# Altium PCB EVT_SYS_CARRIER.PcbDoc
Units mil, origin at the board's own origin, x right, y up, seen from the top; angles counter-clockwise.
Board outline 3937.01 x 3149.61 mil, 4 copper layers (Top Layer, Mid-Layer 1, Mid-Layer 2, Bottom Layer), stack 63.036 mil thick; 92 components, 67 nets, 529 pads, 0 vias.
Unrouted connection lines stored in the file: 272.
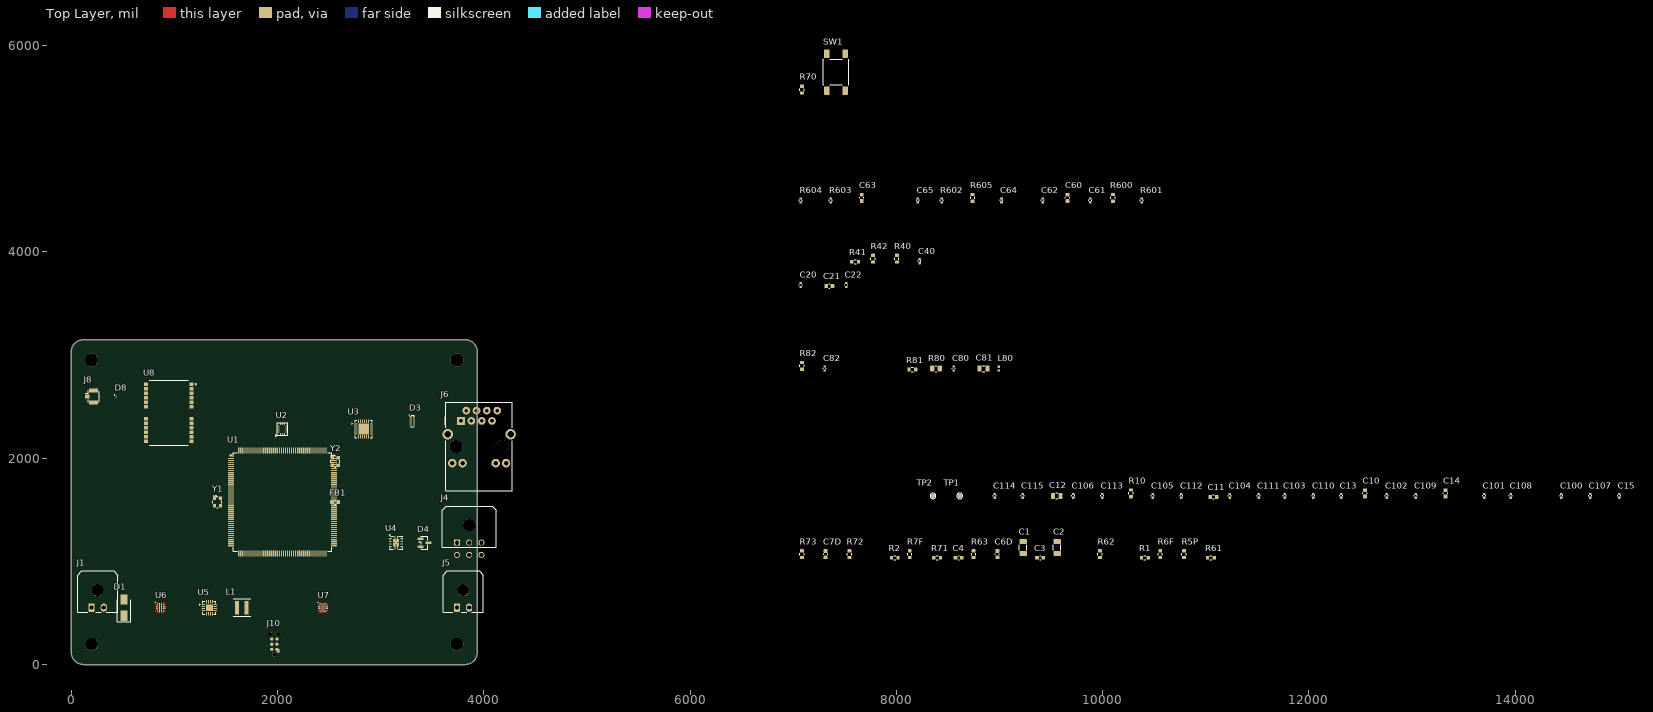
[diagram p0: Top Layer view]
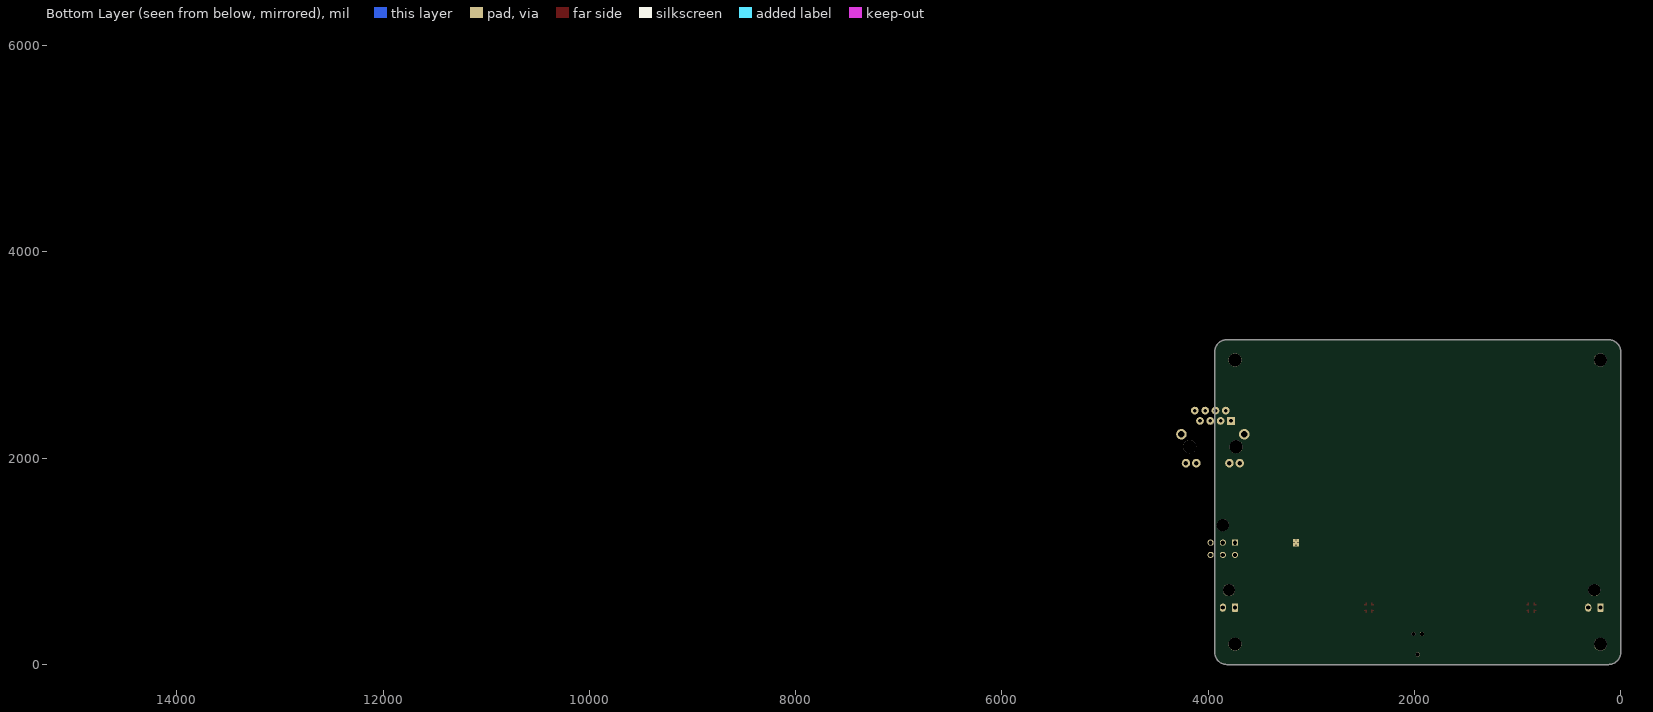
[diagram p1: Bottom Layer view, seen from below]

## Layer stack, top to bottom
Top Solder: solder mask 0.4, Solder Resist, Dk 3.5
Top Layer: signal copper 1.4
Dielectric 2: prepreg 7.0866, PP-006, Dk 4.2
Mid-Layer 1: signal copper 1.378
Dielectric 1: dielectric 43.3071, FR-4, Dk 4.2
Mid-Layer 2: signal copper 1.378
Dielectric 3: prepreg 7.0866, PP-006, Dk 4.2
Bottom Layer: signal copper 1.4
Bottom Solder: solder mask 0.4, Solder Resist, Dk 3.5

## Board outline
118.11,0 cw(c118.11,118.11) 0,118.11 0,3031.5 cw(c118.11,3031.5) 118.11,3149.61 3818.9,3149.61 cw(c3818.9,3031.5) 3937.01,3031.5 3937.01,118.11 cw(c3818.9,118.11) 3818.9,0

## Design rules (kind name [scope] priority, off if disabled: settings)
Clearance R_TIMING_TO_SW_CLEARANCE [InNetClass('NC_TIMING') vs InNet('BUCK_SW')] p1: gap=39.37 ignorepadtopadclearanceinfootprint=FALSE // EVT routing contract
Clearance R_ETH_MDI_CLEARANCE [InDifferentialPairClass('DP_ETH_MDI') vs Not InDifferentialPairClass('DP_ETH_MDI')] p2: gap=7.87 ignorepadtopadclearanceinfootprint=FALSE // EVT routing contract
Clearance R_GENERAL_CLEARANCE [All] p3: gap=7.87 ignorepadtopadclearanceinfootprint=FALSE // EVT routing contract
Clearance [All] p4: gap=10 ignorepadtopadclearanceinfootprint=FALSE
DiffPairsRouting R_CAN_DIFF [InDifferentialPairClass('DP_CAN')] p1: maxlimit=11.81 minlimit=7.87 mostfreqgap=7.87 toplayer_minwidth=7.87 toplayer_maxwidth=11.81 toplayer_prefwidth=7.87 midlayer1_minwidth=7.87 midlayer1_maxwidth=11.81 midlayer1_prefwidth=7.87 midlayer2_minwidth=7.87 midlayer2_maxwidth=11.81 midlayer2_prefwidth=7.87 bottomlayer_minwidth=7.87 bottomlayer_maxwidth=11.81 bottomlayer_prefwidth=7.87 maxuncoupledlength=500 // EVT routing contract
DiffPairsRouting R_ETH_MDI_DIFF [InDifferentialPairClass('DP_ETH_MDI')] p2: maxlimit=7.87 minlimit=7.87 mostfreqgap=7.87 toplayer_minwidth=10.24 toplayer_maxwidth=10.24 toplayer_prefwidth=10.24 midlayer1_minwidth=10.24 midlayer1_maxwidth=10.24 midlayer1_prefwidth=10.24 midlayer2_minwidth=10.24 midlayer2_maxwidth=10.24 midlayer2_prefwidth=10.24 bottomlayer_minwidth=10.24 bottomlayer_maxwidth=10.24 bottomlayer_prefwidth=10.24 maxuncoupledlength=500 // EVT routing contract
DiffPairsRouting [All] p3: maxlimit=10 minlimit=10 mostfreqgap=10 toplayer_minwidth=15 toplayer_maxwidth=15 toplayer_prefwidth=15 midlayer1_minwidth=15 midlayer1_maxwidth=15 midlayer1_prefwidth=15 midlayer2_minwidth=15 midlayer2_maxwidth=15 midlayer2_prefwidth=15 bottomlayer_minwidth=15 bottomlayer_maxwidth=15 bottomlayer_prefwidth=15 maxuncoupledlength=500
PolygonConnect [All] p1: connectstyle=Relief reliefconductorwidth=10 reliefentries=4 polygonreliefangle="90 Angle" airgapwidth=10
RoutingVias [All] p1: holewidth=28 width=50 viastyle="Through Hole" minholewidth=28 minwidth=50 maxholewidth=28 maxwidth=50
SolderMaskExpansion [All] p1: expansion=0 istentingtop=FALSE
Width R_3V3_TRUNK_WIDTH [InNet('3V3')] p1: maxlimit=118.11 minlimit=59.06 preferedwidth=59.06 // EVT routing contract
Width R_RADAR_12V_WIDTH [InNet('RADAR_12V')] p2: maxlimit=118.11 minlimit=59.06 preferedwidth=59.06
Width R_VIN_HIGH_CURRENT [InNet('VIN_RAW','VIN_PROTECTED')] p3: maxlimit=196.85 minlimit=118.11 preferedwidth=118.11
Width R_GNSS_RF_WIDTH [InNet('GNSS_RF')] p4: maxlimit=14.17 minlimit=14.17 preferedwidth=14.17
Width R_GENERAL_WIDTH [All] p5: maxlimit=19.68 minlimit=5.91 preferedwidth=7.87
29 further rules are at their usual default settings.

## Classes and differential pairs
net class NC_IMU_SPI: IMU_MISO IMU_MOSI IMU_NSS IMU_SCK
net class NC_RMII: ETH_50M ETH_CRS_DV ETH_MDC ETH_MDIO ETH_NRST ETH_RXD0 ETH_RXD1 ETH_TX_EN ETH_TXD0 ETH_TXD1
net class NC_TIMING: GNSS_PPS IMU_DRDY RADAR_REF
net class NC_CAN: RADAR_CANH RADAR_CANL
net class NC_GNSS_RF: GNSS_RF
net class NC_ETH_MDI: ETH_RXN ETH_RXP ETH_TXN ETH_TXP
net class NC_POWER_3V3: 3V3 VDDA_FILTERED
net class NC_POWER_12V: RADAR_12V VIN_PROTECTED VIN_RAW
differential pair class DP_CAN: DP_CAN
differential pair class DP_ETH_MDI: DP_ETH_RX DP_ETH_TX
component class 70_DEBUG_BOOT: R70 SW1
component class 60_ETHERNET: C60 C61 C62 C63 C64 C65 D3 J6 R600 R601 R602 R603 R604 R605 U3 Y2
component class 50_RADAR_IO_CAN: C40 D4 J4 J5 R40 R41 R42 U4
component class 40_IMU: C20 C21 C22 U2
component class 30_TIME_GNSS: C80 C81 C82 D8 J8 L80 R80 R81 R82 U8
component class 20_MCU_CORE: C10 C11 C12 C13 C14 C15 C100 C101 C102 C103 C104 C105 C106 C107 C108 C109 C110 C111 C112 C113 C114 C115 FB1 J10 R10 TP1 TP2 U1 Y1
component class 10_POWER_INPUT: C1 C2 C3 C4 C6D C7D D1 J1 L1 R1 R2 R5P R6F R7F R61 R62 R63 R71 R72 R73 U5 U6 U7
differential pair DP_CAN: +RADAR_CANH -RADAR_CANL
differential pair DP_ETH_RX: +ETH_RXP -ETH_RXN
differential pair DP_ETH_TX: +ETH_TXP -ETH_TXN

## Components (designator, comment, footprint, x,y, rotation, side; value= is the part's Value field where it differs from the comment)
C1 "10uF/25V" C_1206_3216Metric 9230,1135 r90 top
C2 "22uF/6.3V" C_1206_3216Metric 9560,1135 r90 top
C3 "3.3nF" C_0603_1608Metric 9395,1035 r0 top
C4 "100nF/25V" C_0603_1608Metric 8605,1035 r0 top
C6D "3.3nF" C_0603_1608Metric 8980,1070 r90 top
C7D "3.3nF" C_0603_1608Metric 7315,1070 r90 top
C10 "2.2uF" C_0603_1608Metric 12545,1660 r90 top
C11 "2.2uF" C_0603_1608Metric 11075,1625 r0 top
C12 "4.7uF" C_0805_2012Metric 9555,1635 r0 top
C13 "100nF" C_0402_1005Metric 12315,1635 r90 top
C14 "1uF" C_0603_1608Metric 13325,1660 r90 top
C15 "100nF" C_0402_1005Metric 15010,1635 r90 top
C20 "100nF" C_0402_1005Metric 7075,3680 r90 top
C21 "2.2uF" C_0603_1608Metric 7350,3670 r0 top
C22 "10nF" C_0402_1005Metric 7515,3680 r90 top
C40 "100nF" C_0402_1005Metric 8225,3910 r90 top
C60 "1uF" C_0603_1608Metric 9660,4525 r90 top
C61 "470pF C0G" C_0402_1005Metric 9880,4500 r90 top
C62 "100nF" C_0402_1005Metric 9420,4500 r90 top
C63 "22nF C0G" C_0603_1608Metric 7665,4525 r90 top
C64 "100nF" C_0402_1005Metric 9020,4500 r90 top
C65 "100nF" C_0402_1005Metric 8210,4500 r90 top
C80 "100nF" C_0402_1005Metric 8555,2870 r90 top
C81 "10uF" C_0805_2012Metric 8845,2870 r0 top
C82 "100nF DNP_OPTION" C_0402_1005Metric 7305,2870 r90 top
C100 "100nF VDD" C_0402_1005Metric 14450,1635 r90 top
C101 "100nF VDD" C_0402_1005Metric 13700,1635 r90 top
C102 "100nF VDD" C_0402_1005Metric 12755,1635 r90 top
C103 "100nF VDD" C_0402_1005Metric 11765,1635 r90 top
C104 "100nF VDD" C_0402_1005Metric 11235,1635 r90 top
C105 "100nF VDD" C_0402_1005Metric 10485,1635 r90 top
C106 "100nF VDD" C_0402_1005Metric 9715,1635 r90 top
C107 "100nF VDD" C_0402_1005Metric 14730,1635 r90 top
C108 "100nF VDD" C_0402_1005Metric 13960,1635 r90 top
C109 "100nF VDD" C_0402_1005Metric 13035,1635 r90 top
C110 "100nF VDD" C_0402_1005Metric 12045,1635 r90 top
C111 "100nF VDD" C_0402_1005Metric 11515,1635 r90 top
C112 "100nF VDD" C_0402_1005Metric 10765,1635 r90 top
C113 "100nF VDD" C_0402_1005Metric 9995,1635 r90 top
C114 "100nF VDD33_USB" C_0402_1005Metric 8955,1635 r90 top
C115 "100nF NRST" C_0402_1005Metric 9225,1635 r90 top
D1 "SMAJ15CA" D_SMA 511.81,551.18 r90 top
D3 "TPD4E05U06DQAR" USON-10_2.5x1.0mm_P0.5mm 3307.09,2362.2 r0 top
D4 "ESD2CANFD24-Q1" SOT-23 3425.2,1181.1 r0 top
D8 "ESD0P2RF-02LS" ESD0P2RF-02LS_PG-TSSLP-2-1 433.07,2598.43 r0 top
FB1 "BLM18BD601SH1" L_0603_1608Metric 2559.06,1574.8 r0 top
J1 "12V_IN" Molex_43650-0200_RA_THT_2P 196.85,551.18 r0 top
J4 "RADAR_IO" Molex_43045-0600_RA_THT_6P 3740.16,1181.1 r0 top
J5 "RADAR_PWR" Molex_43650-0200_RA_THT_2P 3740.16,551.18 r0 top
J6 "SI-60182-F" RJ45_Bel_SI-60062-F 3779.53,2362.2 r0 top
J8 "GNSS_UFL" Hirose_UFL_R_SMT_K 196.85,2598.43 r0 top
J10 "TC2030_SWD" TagConnect_TC2030_NL 1968.5,196.85 r90 top
L1 "2.2uH" Coilcraft_XFL4020_4x4 1653.54,551.18 r0 top
L80 "27nH DNP_OPTION" L_0402_1005Metric 8995,2870 r90 top
R1 "665R 1%" R_0603_1608Metric 10410,1035 r0 top
R2 "1.05k 1%" R_0603_1608Metric 7985,1035 r0 top
R5P "100k 1% PG_PU" R_0603_1608Metric 10790,1070 r90 top
R6F "10k 1% FLT_PU" R_0603_1608Metric 10560,1070 r90 top
R7F "10k 1% FLT_PU" R_0603_1608Metric 8130,1070 r90 top
R10 "10k 1%" R_0603_1608Metric 10275,1660 r90 top
R40 "120R 1% DNP_DEFAULT" R_0603_1608Metric 8005,3935 r90 top
R41 "10k 1% STB_PD" R_0603_1608Metric 7600,3905 r0 top
R42 "10k 1% SHDN_PD" R_0603_1608Metric 7775,3935 r90 top
R61 "470k 1%" R_0603_1608Metric 11050,1035 r0 top
R62 "36.0k 1%" R_0603_1608Metric 9975,1070 r90 top
R63 "41.2k 1%" R_0603_1608Metric 8750,1070 r90 top
R70 "0R DNP_BOOT_OVERRIDE" R_0603_1608Metric 7085,5575 r90 top
R71 "470k 1%" R_0603_1608Metric 8395,1035 r0 top
R72 "16.9k 1%" R_0603_1608Metric 7545,1070 r90 top
R73 "43.7k 1%" R_0603_1608Metric 7085,1070 r90 top
R80 "10R 0.25W DNP_OPTION" R_0805_2012Metric 8385,2870 r0 top
R81 "100k 1% VUSB_PD" R_0603_1608Metric 8155,2860 r0 top
R82 "0R V_BCKP" R_0603_1608Metric 7085,2895 r90 top
R600 "12.1k 1%" R_0603_1608Metric 10100,4525 r90 top
R601 "49.9R 1%" R_0402_1005Metric 10380,4500 r90 top
R602 "49.9R 1%" R_0402_1005Metric 8440,4500 r90 top
R603 "49.9R 1%" R_0402_1005Metric 7365,4500 r90 top
R604 "49.9R 1%" R_0402_1005Metric 7075,4500 r90 top
R605 "10k 1% NRST_PD" R_0603_1608Metric 8740,4525 r90 top
SW1 "NRST" ESwitch_TL3301_GullWing_6x6 7415,5745 r90 top
TP1 "DEBUG_TX" TestPoint_Pad_D1.0mm 8615,1635 r0 top
TP2 "DEBUG_RX" TestPoint_Pad_D1.0mm 8355,1635 r0 top
U1 "STM32H753IIT6" LQFP-176_24x24mm_P0.5mm 2047.24,1574.8 r0 top
U2 "ICM-42688-P" ICM-42688-P_LGA14_2.5x3mm_P0.5mm 2047.24,2283.46 r0 top
U3 "LAN8742Ai-CZ-TR" QFN-24-1EP_4x4mm_P0.5mm_EP2.6x2.6mm 2834.65,2283.46 r0 top
U4 "TCAN3404DRBRQ1" Texas_DRB0008A 3149.61,1181.1 r0 top
U5 "TPS62132RGTR_3V3" VQFN-16-1EP_3x3mm_P0.5mm_EP1.68x1.68mm 1338.58,551.18 r0 top
U6 "TPS259470ARPWR_SYS" TPS259470A_RPW0010A_VQFN-HR-10_2x2mm_P0.475mm 866.14,551.18 r0 top
U7 "TPS259470ARPWR_RADAR" TPS259470A_RPW0010A_VQFN-HR-10_2x2mm_P0.475mm 2440.94,551.18 r0 top
U8 "NEO-M9N-00B" NEO-M9N_LCC24_12.2x16mm 944.88,2440.94 r0 top
Y1 "ECS-2520S33-250-FN-TR" Oscillator_SMD_ECS_2520MV-xxx-xx-4Pin_2.5x2.0mm 1417.32,1574.8 r0 top
Y2 "ECS-2520S33-500-FN-TR" Oscillator_SMD_ECS_2520MV-xxx-xx-4Pin_2.5x2.0mm 2559.06,1968.5 r0 top

## Footprints (in the part's own frame and the unit in brackets; to place one, negate y for a bottom-side part, rotate by r counter-clockwise, add the part's x,y. Pads: shape width x height; smd on the part's side, far side on the other; paste and mask are expansions set on the pad)
C_0402_1005Metric [mm]
  rrect25% 0.56x0.62 smd: 1(-0.48,0) 2(0.48,0)
  silkscreen extent -0.11,-0.36 0.11,0.36
C_0603_1608Metric [mm]
  rrect25% 0.9x0.95 smd: 1(-0.775,0) 2(0.775,0)
  silkscreen extent -0.14,-0.51 0.14,0.51
C_0805_2012Metric [mm]
  rrect25% 1x1.45 smd: 1(-0.95,0) 2(0.95,0)
  silkscreen extent -0.26,-0.73 0.26,0.73
C_1206_3216Metric [mm]
  rrect22% 1.15x1.8 smd: 1(-1.475,0) 2(1.475,0)
  silkscreen extent -0.71,-0.91 0.71,0.91
Coilcraft_XFL4020_4x4 [mm]
  rect 0.98x3.4 smd: 1(-1.185,0) 2(1.185,0)
  silkscreen extent -2.15,-2.15 2.15,2.15
D_SMA [mm]
  rrect14% 2.5x1.8 smd: 1(-2,0) 2(2,0)
  silkscreen extent -3.51,-1.65 2,1.65
ESD0P2RF-02LS_PG-TSSLP-2-1 [mm]
  rect 0.32x0.24 smd: 1(0,0.19) 2(0,-0.19)
  silkscreen extent -0.4,0.32 -0.24,0.48
ESwitch_TL3301_GullWing_6x6 [mm]
  rrect18% 2.1x1.4 smd: 1(-4.55,2.25) 1(4.55,2.25) 2(-4.55,-2.25) 2(4.55,-2.25)
  silkscreen extent -3.1,-3.1 3.1,3.1
Hirose_UFL_R_SMT_K [mm]
  rrect25% 1.05x1 smd: 1(-1.05,0)
  rrect24% 2.2x1.05 smd: 2(0.475,-1.475) 2(0.475,1.475)
  silkscreen extent -1.52,-1.4 1.84,1.4
ICM-42688-P_LGA14_2.5x3mm_P0.5mm [mm]
  rect 0.475x0.25 smd: 1(-1.012,-0.75) 2(-1.012,-0.25) 3(-1.012,0.25) 4(-1.012,0.75) 8(1.012,0.75) 9(1.012,0.25) 10(1.012,-0.25) 11(1.012,-0.75)
  rect 0.25x0.475 smd: 5(-0.5,1.262) 6(0,1.262) 7(0.5,1.262) 12(0.5,-1.262) 13(0,-1.262) 14(-0.5,-1.262)
  silkscreen extent -1.8,-1.8 1.25,1.5
L_0402_1005Metric [mm]
  rrect25% 0.59x0.64 smd: 1(-0.485,0) 2(0.485,0)
L_0603_1608Metric [mm]
  rrect25% 0.875x0.95 smd: 1(-0.787,0) 2(0.787,0)
  silkscreen extent -0.16,-0.51 0.16,0.51
LQFP-176_24x24mm_P0.5mm [mm]
  rrect25% 1.5x0.3 smd: 1(-12.675,10.75) 2(-12.675,10.25) 3(-12.675,9.75) 4(-12.675,9.25) 5(-12.675,8.75) 6(-12.675,8.25) 7(-12.675,7.75) 8(-12.675,7.25) 9(-12.675,6.75) 10(-12.675,6.25) 11(-12.675,5.75) 12(-12.675,5.25) 13(-12.675,4.75) 14(-12.675,4.25) 15(-12.675,3.75) 16(-12.675,3.25) 17(-12.675,2.75) 18(-12.675,2.25) 19(-12.675,1.75) 20(-12.675,1.25) 21(-12.675,0.75) 22(-12.675,0.25) 23(-12.675,-0.25) 24(-12.675,-0.75) 25(-12.675,-1.25) 26(-12.675,-1.75) 27(-12.675,-2.25) 28(-12.675,-2.75) 29(-12.675,-3.25) 30(-12.675,-3.75) 31(-12.675,-4.25) 32(-12.675,-4.75) 33(-12.675,-5.25) 34(-12.675,-5.75) 35(-12.675,-6.25) 36(-12.675,-6.75) 37(-12.675,-7.25) 38(-12.675,-7.75) 39(-12.675,-8.25) 40(-12.675,-8.75) 41(-12.675,-9.25) 42(-12.675,-9.75) 43(-12.675,-10.25) 44(-12.675,-10.75) 89(12.675,-10.75) 90(12.675,-10.25) 91(12.675,-9.75) 92(12.675,-9.25) 93(12.675,-8.75) 94(12.675,-8.25) 95(12.675,-7.75) 96(12.675,-7.25) 97(12.675,-6.75) 98(12.675,-6.25) 99(12.675,-5.75) 100(12.675,-5.25) 101(12.675,-4.75) 102(12.675,-4.25) 103(12.675,-3.75) 104(12.675,-3.25) 105(12.675,-2.75) 106(12.675,-2.25) 107(12.675,-1.75) 108(12.675,-1.25) 109(12.675,-0.75) 110(12.675,-0.25) 111(12.675,0.25) 112(12.675,0.75) 113(12.675,1.25) 114(12.675,1.75) 115(12.675,2.25) 116(12.675,2.75) 117(12.675,3.25) 118(12.675,3.75) 119(12.675,4.25) 120(12.675,4.75) 121(12.675,5.25) 122(12.675,5.75) 123(12.675,6.25) 124(12.675,6.75) 125(12.675,7.25) 126(12.675,7.75) 127(12.675,8.25) 128(12.675,8.75) 129(12.675,9.25) 130(12.675,9.75) 131(12.675,10.25) 132(12.675,10.75)
  rrect25% 0.3x1.5 smd: 45(-10.75,-12.675) 46(-10.25,-12.675) 47(-9.75,-12.675) 48(-9.25,-12.675) 49(-8.75,-12.675) 50(-8.25,-12.675) 51(-7.75,-12.675) 52(-7.25,-12.675) 53(-6.75,-12.675) 54(-6.25,-12.675) 55(-5.75,-12.675) 56(-5.25,-12.675) 57(-4.75,-12.675) 58(-4.25,-12.675) 59(-3.75,-12.675) 60(-3.25,-12.675) 61(-2.75,-12.675) 62(-2.25,-12.675) 63(-1.75,-12.675) 64(-1.25,-12.675) 65(-0.75,-12.675) 66(-0.25,-12.675) 67(0.25,-12.675) 68(0.75,-12.675) 69(1.25,-12.675) 70(1.75,-12.675) 71(2.25,-12.675) 72(2.75,-12.675) 73(3.25,-12.675) 74(3.75,-12.675) 75(4.25,-12.675) 76(4.75,-12.675) 77(5.25,-12.675) 78(5.75,-12.675) 79(6.25,-12.675) 80(6.75,-12.675) 81(7.25,-12.675) 82(7.75,-12.675) 83(8.25,-12.675) 84(8.75,-12.675) 85(9.25,-12.675) 86(9.75,-12.675) 87(10.25,-12.675) 88(10.75,-12.675) 133(10.75,12.675) 134(10.25,12.675) 135(9.75,12.675) 136(9.25,12.675) 137(8.75,12.675) 138(8.25,12.675) 139(7.75,12.675) 140(7.25,12.675) 141(6.75,12.675) 142(6.25,12.675) 143(5.75,12.675) 144(5.25,12.675) 145(4.75,12.675) 146(4.25,12.675) 147(3.75,12.675) 148(3.25,12.675) 149(2.75,12.675) 150(2.25,12.675) 151(1.75,12.675) 152(1.25,12.675) 153(0.75,12.675) 154(0.25,12.675) 155(-0.25,12.675) 156(-0.75,12.675) 157(-1.25,12.675) 158(-1.75,12.675) 159(-2.25,12.675) 160(-2.75,12.675) 161(-3.25,12.675) 162(-3.75,12.675) 163(-4.25,12.675) 164(-4.75,12.675) 165(-5.25,12.675) 166(-5.75,12.675) 167(-6.25,12.675) 168(-6.75,12.675) 169(-7.25,12.675) 170(-7.75,12.675) 171(-8.25,12.675) 172(-8.75,12.675) 173(-9.25,12.675) 174(-9.75,12.675) 175(-10.25,12.675) 176(-10.75,12.675)
  silkscreen extent -13.09,-12.11 12.11,12.11
Molex_43045-0600_RA_THT_6P [mm]
  rrect17% 1.5x1.5 hole 1.02: 1(0,0)
  round 1.5 hole 1.02: 2(3,0) 3(6,0) 4(0,-3) 5(3,-3) 6(6,-3)
  round 3 hole 3: Un1(3,4.32)
  silkscreen extent -3.68,-1.1 9.68,9.03
Molex_43650-0200_RA_THT_2P [mm]
  rrect17% 1.5x2.02 hole 1.02: 1(0,0)
  rrect100% 1.5x2.02 hole 1.02: 2(3,0)
  round 3 hole 3: Un1(1.5,4.32)
  silkscreen extent -3.43,-1.09 6.44,9.03
NEO-M9N_LCC24_12.2x16mm [mm]
  rect 1x0.8 smd: 1(5.6,7) 2(5.6,5.9) 3(5.6,4.8) 4(5.6,3.7) 5(5.6,2.6) 6(5.6,1.5) 7(5.6,-1.5) 8(5.6,-2.6) 9(5.6,-3.7) 10(5.6,-4.8) 11(5.6,-5.9) 12(5.6,-7) 13(-5.6,-7) 14(-5.6,-5.9) 15(-5.6,-4.8) 16(-5.6,-3.7) 17(-5.6,-2.6) 18(-5.6,-1.5) 19(-5.6,1.5) 20(-5.6,2.6) 21(-5.6,3.7) 22(-5.6,4.8) 23(-5.6,5.9) 24(-5.6,7)
  silkscreen extent -4.8,-8 6.8,8
Oscillator_SMD_ECS_2520MV-xxx-xx-4Pin_2.5x2.0mm [mm]
  rrect25% 0.8x0.9 smd: 1(-0.725,0.925) 2(-0.725,-0.925) 3(0.725,-0.925) 4(0.725,0.925)
  silkscreen extent -1.11,-1.36 1.11,1.56
QFN-24-1EP_4x4mm_P0.5mm_EP2.6x2.6mm [mm]
  rrect25% 0.825x0.25 smd: 1(-1.937,1.25) 2(-1.937,0.75) 3(-1.937,0.25) 4(-1.937,-0.25) 5(-1.937,-0.75) 6(-1.937,-1.25) 13(1.937,-1.25) 14(1.937,-0.75) 15(1.937,-0.25) 16(1.937,0.25) 17(1.937,0.75) 18(1.937,1.25)
  rrect25% 0.25x0.825 smd: 7(-1.25,-1.937) 8(-0.75,-1.937) 9(-0.25,-1.937) 10(0.25,-1.937) 11(0.75,-1.937) 12(1.25,-1.937) 19(1.25,1.937) 20(0.75,1.937) 21(0.25,1.937) 22(-0.25,1.937) 23(-0.75,1.937) 24(-1.25,1.937)
  rect 2.6x2.6 smd: 25(0,0)
  rrect24% 1.05x1.05 on Top Paste: Un1(-0.65,0.65) Un2(-0.65,-0.65) Un3(0.65,0.65) Un4(0.65,-0.65)
  silkscreen extent -2.94,-2.11 2.11,2.11
R_0402_1005Metric [mm]
  rrect25% 0.54x0.64 smd: 1(-0.51,0) 2(0.51,0)
  silkscreen extent -0.15,-0.38 0.15,0.38
R_0603_1608Metric [mm]
  rrect25% 0.8x0.95 smd: 1(-0.825,0) 2(0.825,0)
  silkscreen extent -0.24,-0.52 0.24,0.52
R_0805_2012Metric [mm]
  rrect24% 1.025x1.4 smd: 1(-0.913,0) 2(0.913,0)
  silkscreen extent -0.23,-0.73 0.23,0.73
RJ45_Bel_SI-60062-F [mm]
  rect 1.9x1.9 hole 0.9: 1(0,0)
  round 1.9 hole 0.9: 2(1.27,2.54) 3(2.54,0) 4(3.81,2.54) 5(5.08,0) 6(6.35,2.54) 7(7.62,0) 8(8.89,2.54)
  round 2.1 hole 1.1: L1(-2.18,-10.41) L2(0.36,-10.41) L3(8.53,-10.41) L4(11.07,-10.41)
  round 2.6 hole 1.6: SH(-3.3,-3.3) SH(12.19,-3.3)
  round 3.25 hole 3.25: Un1(-1.27,-6.35) Un2(10.16,-6.35)
  silkscreen extent -3.92,-17.24 12.62,4.55
SOT-23 [mm]
  rrect25% 1.475x0.6 smd: 1(-0.937,0.95) 2(-0.937,-0.95) 3(0.937,0)
  silkscreen extent -1.54,-1.56 0.76,1.56
TagConnect_TC2030_NL [mil]
  round 31 smd: 1(-50,-25) 2(-50,25) 3(0,-25) 4(0,25) 5(50,-25) 6(50,25)
  round 39 hole 39: Un1(-100,0) Un2(100,40) Un3(100,-40)
  silkscreen extent -75,-50 -50,-25
TestPoint_Pad_D1.0mm [mm]
  round 1 smd: 1(0,0)
  silkscreen extent -0.7,-0.7 0.7,0.7
Texas_DRB0008A [mm]
  rrect16% 0.6x0.31 smd: 1(-1.4,0.975) 2(-1.4,0.325) 3(-1.4,-0.325) 4(-1.4,-0.975) 5(1.4,-0.975) 6(1.4,-0.325) 7(1.4,0.325) 8(1.4,0.975)
  round 0.5 hole 0.2: 9(-0.5,0) 9(0,-0.625) 9(0,0.625) 9(0.5,0)
  rrect22% 0.23x1.025 smd: 9(-0.325,-1.188) 9(-0.325,1.188) 9(0.325,-1.188) 9(0.325,1.188)
  rrect3% 1.5x1.75 smd: 9(0,0)
  rrect3% 1.5x1.75 smd far side: 9(0,0)
  rrect22% 0.23x0.725 on Top Paste: Un1(-0.325,1.337) Un2(-0.325,-1.337) Un4(0.325,1.337) Un5(0.325,-1.337)
  rrect4% 1.34x1.55 on Top Paste: Un3(0,0)
  silkscreen extent -1.85,-1.61 1.61,1.94
TPS259470A_RPW0010A_VQFN-HR-10_2x2mm_P0.475mm [mm]
  round 0.25 smd: 1(-0.725,0.875) 4(-0.725,-0.875) 7(0.725,-0.875) 10(0.725,0.875)
  rrect17% 0.6x0.3 smd: 2(-0.9,0.225) 3(-0.9,-0.225) 8(0.9,-0.225) 9(0.9,0.225)
  rrect17% 0.3x2.4 smd: 5(-0.25,0) 6(0.25,0)
  rrect17% 0.3x1.05 on Top Paste: Un1(-0.25,0.675) Un2(-0.25,-0.675) Un3(0.25,0.675) Un4(0.25,-0.675)
  Top Layer region: 0.8,0.8 1.15,0.8 1.15,0.6 0.65,0.6 0.65,1.15 0.8,1.15
  Top Layer region: 0.819,1.196 0.835,1.185 0.846,1.169 0.85,1.15 0.85,0.6 0.846,0.581 0.835,0.565 0.819,0.554 0.8,0.55 0.65,0.55 0.631,0.554 0.615,0.565 0.604,0.581 0.6,0.6 0.6,1.15 0.604,1.169 0.615,1.185 0.631,1.196 0.65,1.2 0.8,1.2
  Top Layer region: 1.15,-0.8 0.8,-0.8 0.8,-1.15 0.65,-1.15 0.65,-0.6 1.15,-0.6
  Top Layer region: 0.819,-0.554 0.835,-0.565 0.846,-0.581 0.85,-0.6 0.85,-1.15 0.846,-1.169 0.835,-1.185 0.819,-1.196 0.8,-1.2 0.65,-1.2 0.631,-1.196 0.615,-1.185 0.604,-1.169 0.6,-1.15 0.6,-0.6 0.604,-0.581 0.615,-0.565 0.631,-0.554 0.65,-0.55 0.8,-0.55
  Top Layer region: -0.65,-1.15 -0.8,-1.15 -0.8,-0.8 -1.15,-0.8 -1.15,-0.6 -0.65,-0.6
  Top Layer region: -0.631,-0.554 -0.615,-0.565 -0.604,-0.581 -0.6,-0.6 -0.6,-1.15 -0.604,-1.169 -0.615,-1.185 -0.631,-1.196 -0.65,-1.2 -0.8,-1.2 -0.819,-1.196 -0.835,-1.185 -0.846,-1.169 -0.85,-1.15 -0.85,-0.6 -0.846,-0.581 -0.835,-0.565 -0.819,-0.554 -0.8,-0.55 -0.65,-0.55
  Top Layer region: -0.65,0.6 -1.15,0.6 -1.15,0.8 -0.8,0.8 -0.8,1.15 -0.65,1.15
  Top Layer region: -0.631,1.196 -0.615,1.185 -0.604,1.169 -0.6,1.15 -0.6,0.6 -0.604,0.581 -0.615,0.565 -0.631,0.554 -0.65,0.55 -0.8,0.55 -0.819,0.554 -0.835,0.565 -0.846,0.581 -0.85,0.6 -0.85,1.15 -0.846,1.169 -0.835,1.185 -0.819,1.196 -0.8,1.2 -0.65,1.2
  silkscreen extent -1.43,1.15 -1.15,1.43
USON-10_2.5x1.0mm_P0.5mm [mm]
  rrect25% 0.55x0.3 smd: 1(-0.385,1) 2(-0.385,0.5) 3(-0.385,0) 4(-0.385,-0.5) 5(-0.385,-1) 6(0.385,-1) 7(0.385,-0.5) 8(0.385,0) 9(0.385,0.5) 10(0.385,1)
  silkscreen extent -0.9,-1.41 0.5,1.69
VQFN-16-1EP_3x3mm_P0.5mm_EP1.68x1.68mm [mm]
  rrect25% 0.825x0.25 smd: 1(-1.462,0.75) 2(-1.462,0.25) 3(-1.462,-0.25) 4(-1.462,-0.75) 9(1.462,-0.75) 10(1.462,-0.25) 11(1.462,0.25) 12(1.462,0.75)
  rrect25% 0.25x0.825 smd: 5(-0.75,-1.462) 6(-0.25,-1.462) 7(0.25,-1.462) 8(0.75,-1.462) 13(0.75,1.462) 14(0.25,1.462) 15(-0.25,1.462) 16(-0.75,1.462)
  rect 1.68x1.68 smd: 17(0,0)
  rrect25% 0.68x0.68 on Top Paste: Un1(-0.42,0.42) Un2(-0.42,-0.42) Un3(0.42,0.42) Un4(0.42,-0.42)
  silkscreen extent -2.47,-1.61 1.61,1.61

## Part data
C1: library part C, MPN=10uF_25V_X7R, hierarchy_path=/bb847286-0d74-45ea-ae19-a7a9011f1e25/b624852f-1277-4a55-b4fa-960468381384
C2: library part C, MPN=22uF_6.3V_X7R, hierarchy_path=/bb847286-0d74-45ea-ae19-a7a9011f1e25/b624852f-1277-4a55-b4fa-960468381384
C3 C6D C7D: library part C, MPN=3.3nF_X7R, hierarchy_path=/bb847286-0d74-45ea-ae19-a7a9011f1e25/b624852f-1277-4a55-b4fa-960468381384
C4: library part C, MPN=100nF_25V_X7R, hierarchy_path=/bb847286-0d74-45ea-ae19-a7a9011f1e25/b624852f-1277-4a55-b4fa-960468381384
C10 C11 C21: library part C, MPN=2.2uF_6.3V_X7R
  C10 C11: hierarchy_path=/bb847286-0d74-45ea-ae19-a7a9011f1e25/aa1f510d-c66e-4213-83c2-72045df318bd
  C21: hierarchy_path=/bb847286-0d74-45ea-ae19-a7a9011f1e25/78018483-f5fa-476c-be43-fa727552722e
C12: library part C, MPN=4.7uF_6.3V_X7R, hierarchy_path=/bb847286-0d74-45ea-ae19-a7a9011f1e25/aa1f510d-c66e-4213-83c2-72045df318bd
C13 C15 C20 C40 C62 C64 C65 C100 C101 C102 C103 C104 C105 C106 C107 C108 C109 C110 C111 C112 C113 C114 C115: library part C, MPN=100nF_6.3V_X7R
  C13 C15: hierarchy_path=/bb847286-0d74-45ea-ae19-a7a9011f1e25/aa1f510d-c66e-4213-83c2-72045df318bd
  C20: hierarchy_path=/bb847286-0d74-45ea-ae19-a7a9011f1e25/78018483-f5fa-476c-be43-fa727552722e
  C40: hierarchy_path=/bb847286-0d74-45ea-ae19-a7a9011f1e25/337840cd-3a7e-4401-9d28-d23a335d9e78
  C62: Decouples_U3_Pin=1, hierarchy_path=/bb847286-0d74-45ea-ae19-a7a9011f1e25/d0e4cb0b-310f-4e8a-9a2f-3a4bcfa75188
  C64: Decouples_U3_Pin=9, hierarchy_path=/bb847286-0d74-45ea-ae19-a7a9011f1e25/d0e4cb0b-310f-4e8a-9a2f-3a4bcfa75188
  C65: Decouples_U3_Pin=19, hierarchy_path=/bb847286-0d74-45ea-ae19-a7a9011f1e25/d0e4cb0b-310f-4e8a-9a2f-3a4bcfa75188
  C100: Decouples_U1_Pin=15, hierarchy_path=/bb847286-0d74-45ea-ae19-a7a9011f1e25/aa1f510d-c66e-4213-83c2-72045df318bd
  C101: Decouples_U1_Pin=23, hierarchy_path=/bb847286-0d74-45ea-ae19-a7a9011f1e25/aa1f510d-c66e-4213-83c2-72045df318bd
  C102: Decouples_U1_Pin=36, hierarchy_path=/bb847286-0d74-45ea-ae19-a7a9011f1e25/aa1f510d-c66e-4213-83c2-72045df318bd
  C103: Decouples_U1_Pin=49, hierarchy_path=/bb847286-0d74-45ea-ae19-a7a9011f1e25/aa1f510d-c66e-4213-83c2-72045df318bd
  C104: Decouples_U1_Pin=62, hierarchy_path=/bb847286-0d74-45ea-ae19-a7a9011f1e25/aa1f510d-c66e-4213-83c2-72045df318bd
  C105: Decouples_U1_Pin=72, hierarchy_path=/bb847286-0d74-45ea-ae19-a7a9011f1e25/aa1f510d-c66e-4213-83c2-72045df318bd
  C106: Decouples_U1_Pin=82, hierarchy_path=/bb847286-0d74-45ea-ae19-a7a9011f1e25/aa1f510d-c66e-4213-83c2-72045df318bd
  C107: Decouples_U1_Pin=91, hierarchy_path=/bb847286-0d74-45ea-ae19-a7a9011f1e25/aa1f510d-c66e-4213-83c2-72045df318bd
  C108: Decouples_U1_Pin=103, hierarchy_path=/bb847286-0d74-45ea-ae19-a7a9011f1e25/aa1f510d-c66e-4213-83c2-72045df318bd
  C109: Decouples_U1_Pin=127, hierarchy_path=/bb847286-0d74-45ea-ae19-a7a9011f1e25/aa1f510d-c66e-4213-83c2-72045df318bd
  C110: Decouples_U1_Pin=136, hierarchy_path=/bb847286-0d74-45ea-ae19-a7a9011f1e25/aa1f510d-c66e-4213-83c2-72045df318bd
  C111: Decouples_U1_Pin=149, hierarchy_path=/bb847286-0d74-45ea-ae19-a7a9011f1e25/aa1f510d-c66e-4213-83c2-72045df318bd
  C112: Decouples_U1_Pin=159, hierarchy_path=/bb847286-0d74-45ea-ae19-a7a9011f1e25/aa1f510d-c66e-4213-83c2-72045df318bd
  C113: Decouples_U1_Pin=172, hierarchy_path=/bb847286-0d74-45ea-ae19-a7a9011f1e25/aa1f510d-c66e-4213-83c2-72045df318bd
  C114: Decouples_U1_Pin=114, hierarchy_path=/bb847286-0d74-45ea-ae19-a7a9011f1e25/aa1f510d-c66e-4213-83c2-72045df318bd
  C115: Filters_U1_Pin=31, hierarchy_path=/bb847286-0d74-45ea-ae19-a7a9011f1e25/aa1f510d-c66e-4213-83c2-72045df318bd
C14 C60: library part C, MPN=1uF_6.3V_X7R
  C14: hierarchy_path=/bb847286-0d74-45ea-ae19-a7a9011f1e25/aa1f510d-c66e-4213-83c2-72045df318bd
  C60: hierarchy_path=/bb847286-0d74-45ea-ae19-a7a9011f1e25/d0e4cb0b-310f-4e8a-9a2f-3a4bcfa75188
C22: library part C, MPN=10nF_6.3V_X7R, hierarchy_path=/bb847286-0d74-45ea-ae19-a7a9011f1e25/78018483-f5fa-476c-be43-fa727552722e
C61: library part C, MPN=470pF_C0G, hierarchy_path=/bb847286-0d74-45ea-ae19-a7a9011f1e25/d0e4cb0b-310f-4e8a-9a2f-3a4bcfa75188
C63: library part C, MPN=22nF_C0G, hierarchy_path=/bb847286-0d74-45ea-ae19-a7a9011f1e25/d0e4cb0b-310f-4e8a-9a2f-3a4bcfa75188
C80 C82: library part C, MPN=100nF_16V_X7R, hierarchy_path=/bb847286-0d74-45ea-ae19-a7a9011f1e25/b78ef022-ef9f-4274-a87c-1bce56b9a8f5
C81: library part C, MPN=10uF_6.3V_X7R, hierarchy_path=/bb847286-0d74-45ea-ae19-a7a9011f1e25/b78ef022-ef9f-4274-a87c-1bce56b9a8f5
D1 D8: library part D_TVS
  D1: hierarchy_path=/bb847286-0d74-45ea-ae19-a7a9011f1e25/b624852f-1277-4a55-b4fa-960468381384, MPN=SMAJ15CA
  D8: hierarchy_path=/bb847286-0d74-45ea-ae19-a7a9011f1e25/b78ef022-ef9f-4274-a87c-1bce56b9a8f5, MPN=ESD0P2RF-02LS
D4: library part ESD2CANFD24DBZRQ1, Capture_Status=LOCAL_CONTRACT_SYMBOL, hierarchy_path=/bb847286-0d74-45ea-ae19-a7a9011f1e25/337840cd-3a7e-4401-9d28-d23a335d9e78, MPN=ESD2CANFD24DBZRQ1
FB1: library part L_Ferrite, hierarchy_path=/bb847286-0d74-45ea-ae19-a7a9011f1e25/aa1f510d-c66e-4213-83c2-72045df318bd, MPN=BLM18BD601SH1
J1 J5: library part Conn_01x02, MPN=43650-0200
  J1: hierarchy_path=/bb847286-0d74-45ea-ae19-a7a9011f1e25/b624852f-1277-4a55-b4fa-960468381384
  J5: hierarchy_path=/bb847286-0d74-45ea-ae19-a7a9011f1e25/337840cd-3a7e-4401-9d28-d23a335d9e78
J4: library part Conn_01x06, MPN=43045-0600, hierarchy_path=/bb847286-0d74-45ea-ae19-a7a9011f1e25/337840cd-3a7e-4401-9d28-d23a335d9e78
J6: library part RJ45_Bel_SI-60062-F, Compatibility_Basis=Bel_SI-60182-F_vs_SI-60062-F_verified, hierarchy_path=/bb847286-0d74-45ea-ae19-a7a9011f1e25/d0e4cb0b-310f-4e8a-9a2f-3a4bcfa75188, MPN=SI-60182-F
J8: library part Conn_01x02, MPN=U.FL-R-SMT-K(800), hierarchy_path=/bb847286-0d74-45ea-ae19-a7a9011f1e25/b78ef022-ef9f-4274-a87c-1bce56b9a8f5
J10: library part Conn_01x06, MPN=TC2030-NL_TARGET, hierarchy_path=/bb847286-0d74-45ea-ae19-a7a9011f1e25/aa1f510d-c66e-4213-83c2-72045df318bd
L1: library part L, MPN=XFL4020-222MEC, hierarchy_path=/bb847286-0d74-45ea-ae19-a7a9011f1e25/b624852f-1277-4a55-b4fa-960468381384
L80: library part L, MPN=27nH_0402, hierarchy_path=/bb847286-0d74-45ea-ae19-a7a9011f1e25/b78ef022-ef9f-4274-a87c-1bce56b9a8f5
R1: library part R, MPN=665R_1%, hierarchy_path=/bb847286-0d74-45ea-ae19-a7a9011f1e25/b624852f-1277-4a55-b4fa-960468381384
R2: library part R, MPN=1.05k_1%, hierarchy_path=/bb847286-0d74-45ea-ae19-a7a9011f1e25/b624852f-1277-4a55-b4fa-960468381384
R5P R81: library part R, MPN=100k_1%
  R5P: hierarchy_path=/bb847286-0d74-45ea-ae19-a7a9011f1e25/b624852f-1277-4a55-b4fa-960468381384
  R81: hierarchy_path=/bb847286-0d74-45ea-ae19-a7a9011f1e25/b78ef022-ef9f-4274-a87c-1bce56b9a8f5
R6F R7F R10 R41 R42 R605: library part R, MPN=10k_1%
  R6F R7F: hierarchy_path=/bb847286-0d74-45ea-ae19-a7a9011f1e25/b624852f-1277-4a55-b4fa-960468381384
  R10: hierarchy_path=/bb847286-0d74-45ea-ae19-a7a9011f1e25/aa1f510d-c66e-4213-83c2-72045df318bd
  R41 R42: hierarchy_path=/bb847286-0d74-45ea-ae19-a7a9011f1e25/337840cd-3a7e-4401-9d28-d23a335d9e78
  R605: hierarchy_path=/bb847286-0d74-45ea-ae19-a7a9011f1e25/d0e4cb0b-310f-4e8a-9a2f-3a4bcfa75188
R40: library part R, MPN=120R_1%, hierarchy_path=/bb847286-0d74-45ea-ae19-a7a9011f1e25/337840cd-3a7e-4401-9d28-d23a335d9e78
R61 R71: library part R, MPN=470k_1%, hierarchy_path=/bb847286-0d74-45ea-ae19-a7a9011f1e25/b624852f-1277-4a55-b4fa-960468381384
R62: library part R, MPN=36.0k_1%, hierarchy_path=/bb847286-0d74-45ea-ae19-a7a9011f1e25/b624852f-1277-4a55-b4fa-960468381384
R63: library part R, MPN=41.2k_1%, hierarchy_path=/bb847286-0d74-45ea-ae19-a7a9011f1e25/b624852f-1277-4a55-b4fa-960468381384
R70 R82: library part R, MPN=0R
  R70: hierarchy_path=/bb847286-0d74-45ea-ae19-a7a9011f1e25/dc3b6991-36b2-4910-bcdb-56ee1ddb4184
  R82: hierarchy_path=/bb847286-0d74-45ea-ae19-a7a9011f1e25/b78ef022-ef9f-4274-a87c-1bce56b9a8f5
R72: library part R, MPN=16.9k_1%, hierarchy_path=/bb847286-0d74-45ea-ae19-a7a9011f1e25/b624852f-1277-4a55-b4fa-960468381384
R73: library part R, MPN=43.7k_1%, hierarchy_path=/bb847286-0d74-45ea-ae19-a7a9011f1e25/b624852f-1277-4a55-b4fa-960468381384
R80: library part R, MPN=10R_0.25W, hierarchy_path=/bb847286-0d74-45ea-ae19-a7a9011f1e25/b78ef022-ef9f-4274-a87c-1bce56b9a8f5
R600: library part R, MPN=12.1k_1%, hierarchy_path=/bb847286-0d74-45ea-ae19-a7a9011f1e25/d0e4cb0b-310f-4e8a-9a2f-3a4bcfa75188
R601 R602 R603 R604: library part R, MPN=49.9R_1%, hierarchy_path=/bb847286-0d74-45ea-ae19-a7a9011f1e25/d0e4cb0b-310f-4e8a-9a2f-3a4bcfa75188
SW1: library part SW_Push, MPN=TL3301NF160QG, hierarchy_path=/bb847286-0d74-45ea-ae19-a7a9011f1e25/dc3b6991-36b2-4910-bcdb-56ee1ddb4184
TP1 TP2: library part TestPoint, hierarchy_path=/bb847286-0d74-45ea-ae19-a7a9011f1e25/aa1f510d-c66e-4213-83c2-72045df318bd
  TP1: MPN=DEBUG_TX
  TP2: MPN=DEBUG_RX
U1: library part STM32H753IITx, hierarchy_path=/bb847286-0d74-45ea-ae19-a7a9011f1e25/aa1f510d-c66e-4213-83c2-72045df318bd, MPN=STM32H753IIT6
U3: library part LAN8742A, hierarchy_path=/bb847286-0d74-45ea-ae19-a7a9011f1e25/d0e4cb0b-310f-4e8a-9a2f-3a4bcfa75188, MPN=LAN8742Ai-CZ-TR
U5: library part TPS62132RGTR, Capture_Status=LOCAL_CONTRACT_SYMBOL, hierarchy_path=/bb847286-0d74-45ea-ae19-a7a9011f1e25/b624852f-1277-4a55-b4fa-960468381384, MPN=TPS62132RGTR
U6 U7: library part TPS259470ARPWR, Capture_Status=LOCAL_CONTRACT_SYMBOL, hierarchy_path=/bb847286-0d74-45ea-ae19-a7a9011f1e25/b624852f-1277-4a55-b4fa-960468381384, MPN=TPS259470ARPWR
U8: library part NEO-M9N, hierarchy_path=/bb847286-0d74-45ea-ae19-a7a9011f1e25/b78ef022-ef9f-4274-a87c-1bce56b9a8f5, MPN=NEO-M9N-00B
D3: Capture_Status=LOCAL_CONTRACT_SYMBOL, hierarchy_path=/bb847286-0d74-45ea-ae19-a7a9011f1e25/d0e4cb0b-310f-4e8a-9a2f-3a4bcfa75188, MPN=TPD4E05U06DQAR
U2: Capture_Status=LOCAL_CONTRACT_SYMBOL, hierarchy_path=/bb847286-0d74-45ea-ae19-a7a9011f1e25/78018483-f5fa-476c-be43-fa727552722e, MPN=ICM-42688-P
U4: Capture_Status=LOCAL_CONTRACT_SYMBOL, hierarchy_path=/bb847286-0d74-45ea-ae19-a7a9011f1e25/337840cd-3a7e-4401-9d28-d23a335d9e78, MPN=TCAN3404DRBRQ1
Y1: Capture_Status=LOCAL_CONTRACT_SYMBOL, hierarchy_path=/bb847286-0d74-45ea-ae19-a7a9011f1e25/aa1f510d-c66e-4213-83c2-72045df318bd, MPN=ECS-2520S33-250-FN-TR
Y2: Capture_Status=LOCAL_CONTRACT_SYMBOL, hierarchy_path=/bb847286-0d74-45ea-ae19-a7a9011f1e25/d0e4cb0b-310f-4e8a-9a2f-3a4bcfa75188, MPN=ECS-2520S33-500-FN-TR

## Free pads (board coordinates)
  round 125.98 hole 125.98 unplated: H1(196.85,196.85) H2(3740.16,196.85) H3(196.85,2952.76) H4(3740.16,2952.76)

## Nets (pads, with @x,y where several pads share a name; then routed paths per layer and width w, separated by ;. In a path a pad name is that pad's centre, name@x,y a point inside that pad or via, vN(x,y) a via of type N, cw(c..) or ccw(c..) an arc to the next point about the centre after c; other vN are vias at no path point)
3V3: C2.1 C12.1 C15.1 C20.1 C21.1 C22.1 C40.1 C61.1 C62.1 C64.1 C65.1 C80.1 C81.1 C100.1 C101.1 C102.1 C103.1 C104.1 C105.1 C106.1 C107.1 C108.1 C109.1 C110.1 C111.1 C112.1 C113.1 C114.1 FB1.1 J10.1 L1.2 R5P.2 R6F.2 R7F.2 R70.2 R82.2 R601.2 R602.2 R603.2 R604.2 U1.6 U1.15 U1.23 U1.36 U1.49 U1.62 U1.72 U1.82 U1.91 U1.103 U1.114 U1.127 U1.136 U1.149 U1.159 U1.171 U1.172 U2.5 U2.8 U3.1 U3.9 U3.19 U4.3 U5.14 U8.4 U8.23 Y1.4 Y2.4
BOOT0: R10.1 R70.1 U1.166
BUCK_SW: L1.1 U5.1 U5.2 U5.3
CAN_RX: U1.142 U4.4
CAN_TX: U1.143 U4.1
DEBUG_RX: TP2.1 U1.150
DEBUG_TX: TP1.1 U1.147
ETH_50M: U1.41 U3.5 Y2.3
ETH_CRS_DV: U1.53 U3.11
ETH_CT: C63.1 J6.2 J6.5
ETH_MDC: U1.33 U3.13
ETH_MDIO: U1.42 U3.12
ETH_NRST: R605.1 U1.3 U3.15
ETH_RXD0: U1.54 U3.8
ETH_RXD1: U1.55 U3.7
ETH_RXN: D3.5 J6.6 R604.1 U3.22
ETH_RXP: D3.4 J6.4 R603.1 U3.23
ETH_TX_EN: U1.154 U3.16
ETH_TXD0: U1.156 U3.17
ETH_TXD1: U1.157 U3.18
ETH_TXN: D3.2 J6.3 R602.1 U3.20
ETH_TXP: D3.1 J6.1 R601.1 U3.21
GND: C1.2 C2.2 C3.2 C4.2 C6D.2 C7D.2 C10.2 C11.2 C12.2 C13.2 C14.2 C15.2 C20.2 C21.2 C22.2 C40.2 C60.2 C61.2 C62.2 C63.2 C64.2 C65.2 C80.2 C81.2 C82.2 C100.2 C101.2 C102.2 C103.2 C104.2 C105.2 C106.2 C107.2 C108.2 C109.2 C110.2 C111.2 C112.2 C113.2 C114.2 C115.2 D1.2 D3.3 D3.8 D4.3 D8.2 J1.2 J4.2 J4.5 J5.2 J8.2 J10.3 J10.5 R1.2 R2.2 R10.2 R41.2 R42.2 R63.2 R73.2 R81.2 R600.2 R605.2 SW1.2 U1.14 U1.22 U1.37 U1.48 U1.61 U1.71 U1.90 U1.102 U1.113 U1.126 U1.135 U1.148 U1.158 U2.6 U2.7 U2.9 U3.25 U4.2 U4.9 U5.5 U5.6 U5.15 U5.16 U5.17 U6.8 U7.8 U8.2 U8.10 U8.12 U8.13 U8.24 Y1.2 Y2.2
GNSS_BCKP_LOCAL: R82.1 U8.22
GNSS_BIAS_FILTER: C82.1 L80.1 R80.2
GNSS_PPS: U1.40 U8.3
GNSS_RF: D8.1 J8.1 L80.2 U8.11
GNSS_RX_EXT: U1.96 U8.21
GNSS_TX_EXT: U1.97 U8.20
GNSS_VCC_RF: R80.1 U8.9
GNSS_VUSB_LOCAL: R81.1 U8.7
IMU_DRDY: U1.80 U2.4
IMU_MISO: U1.94 U2.1
IMU_MOSI: U1.95 U2.14
IMU_NSS: U1.92 U2.12
IMU_SCK: U1.93 U2.13
MCU_HSE_25M: U1.29 Y1.3
NetC60_1: C60.1 U3.6
NetJ6_8: J6.8 J6.SH
NetR41_1: R41.1 U4.8
NetR42_1: R42.1 U4.5
NetR600_1: R600.1 U3.24
NRST: C115.1 SW1.1 U1.31
RADAR_12V: J5.1 U7.6
RADAR_CANH: D4.1 J4.3 R40.1 U4.7
RADAR_CANL: D4.2 J4.1 R40.2 U4.6
RADAR_EFUSE_FLT: R7F.1 U1.2 U7.4
RADAR_REF: J4.4 U1.79
SWCLK: J10.4 U1.137
SWDIO: J10.2 U1.124
SWO: J10.6 U1.161
SYS_EFUSE_FLT: R6F.1 U1.1 U6.4
U5_PG: R5P.1 U5.4
U5_SS_LOCAL: C3.1 U5.9
U6_DVDT: C6D.1 U6.7
U6_ILIM_LOCAL: R1.1 U6.9
U6_OVLO_LOCAL: R62.2 R63.1 U6.2
U6_UVLO_LOCAL: R61.2 R62.1 U6.1
U7_DVDT: C7D.1 U7.7
U7_ILIM_LOCAL: R2.1 U7.9
U7_OVLO_LOCAL: R72.2 R73.1 U7.2
U7_UVLO_LOCAL: R71.2 R72.1 U7.1
VCAP1_LOCAL: C10.1 U1.81
VCAP2_LOCAL: C11.1 U1.125
VDDA_FILTERED: C13.1 C14.1 FB1.2 U1.38 U1.39
VIN_PROTECTED: C1.1 C4.1 R71.1 U5.10 U5.11 U5.12 U5.13 U6.6 U7.5
VIN_RAW: D1.1 J1.1 R61.1 U6.5
pads on no net: D3.6 D3.7 D3.9 D3.10 J1.Un1 J4.6 J4.Un1 J5.Un1 J6.7 J6.L1 J6.L2 J6.L3 J6.L4 J6.Un1 J6.Un2 J10.Un1 J10.Un2 J10.Un3 U1.4 U1.5 U1.7 U1.8 U1.9 U1.10 U1.11 U1.12 U1.13 U1.16 U1.17 U1.18 U1.19 U1.20 U1.21 U1.24 U1.25 U1.26 U1.27 U1.28 U1.30 U1.32 U1.34 U1.35 U1.43 U1.44 U1.45 U1.46 U1.47 U1.50 U1.51 U1.52 U1.56 U1.57 U1.58 U1.59 U1.60 U1.63 U1.64 U1.65 U1.66 U1.67 U1.68 U1.69 U1.70 U1.73 U1.74 U1.75 U1.76 U1.77 U1.78 U1.83 U1.84 U1.85 U1.86 U1.87 U1.88 U1.89 U1.98 U1.99 U1.100 U1.101 U1.104 U1.105 U1.106 U1.107 U1.108 U1.109 U1.110 U1.111 U1.112 U1.115 U1.116 U1.117 U1.118 U1.119 U1.120 U1.121 U1.122 U1.123 U1.128 U1.129 U1.130 U1.131 U1.132 U1.133 U1.134 U1.138 U1.139 U1.140 U1.141 U1.144 U1.145 U1.146 U1.151 U1.152 U1.153 U1.155 U1.160 U1.162 U1.163 U1.164 U1.165 U1.167 U1.168 U1.169 U1.170 U1.173 U1.174 U1.175 U1.176 U2.2 U2.3 U2.10 U2.11 U3.2 U3.3 U3.4 U3.10 U3.14 U3.Un1 U3.Un2 U3.Un3 U3.Un4 U4.Un1 U4.Un2 U4.Un3 U4.Un4 U4.Un5 U5.7 U5.8 U5.Un1 U5.Un2 U5.Un3 U5.Un4 U6.3 U6.10 U6.Un1 U6.Un2 U6.Un3 U6.Un4 U7.3 U7.10 U7.Un1 U7.Un2 U7.Un3 U7.Un4 U8.1 U8.5 U8.6 U8.8 U8.14 U8.15 U8.16 U8.17 U8.18 U8.19 Y1.1 Y2.1

## Silkscreen, mask and mechanical layers (free items; w line width, h text height)
Mechanical 1:
  the board outline again, w3.94

## Text inside footprints (layer, text, board x,y; h text height)
J10: Mechanical 7 "KEEPOUT" at 1979.13,147.2 h15.75 r90